# Altium PCB Acorn_Podulator_A4.PcbDoc
Units mil, origin at the board's own origin, x right, y up, seen from the top; angles counter-clockwise.
Board outline 1299.21 x 3818.9 mil, 2 copper layers (Top Layer, Bottom Layer), stack 61.855 mil thick; 6 components, 57 nets, 102 pads, 48 vias.
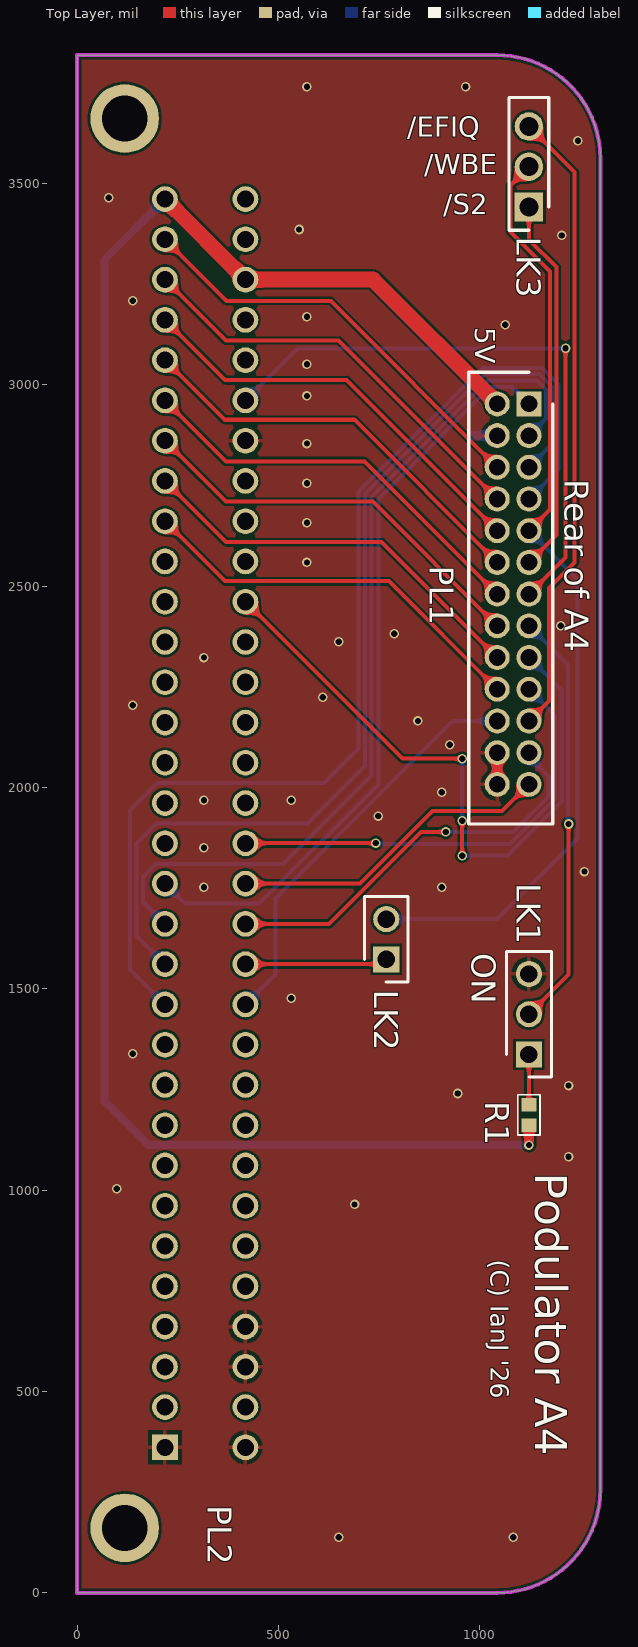
[diagram p0: Top Layer view]
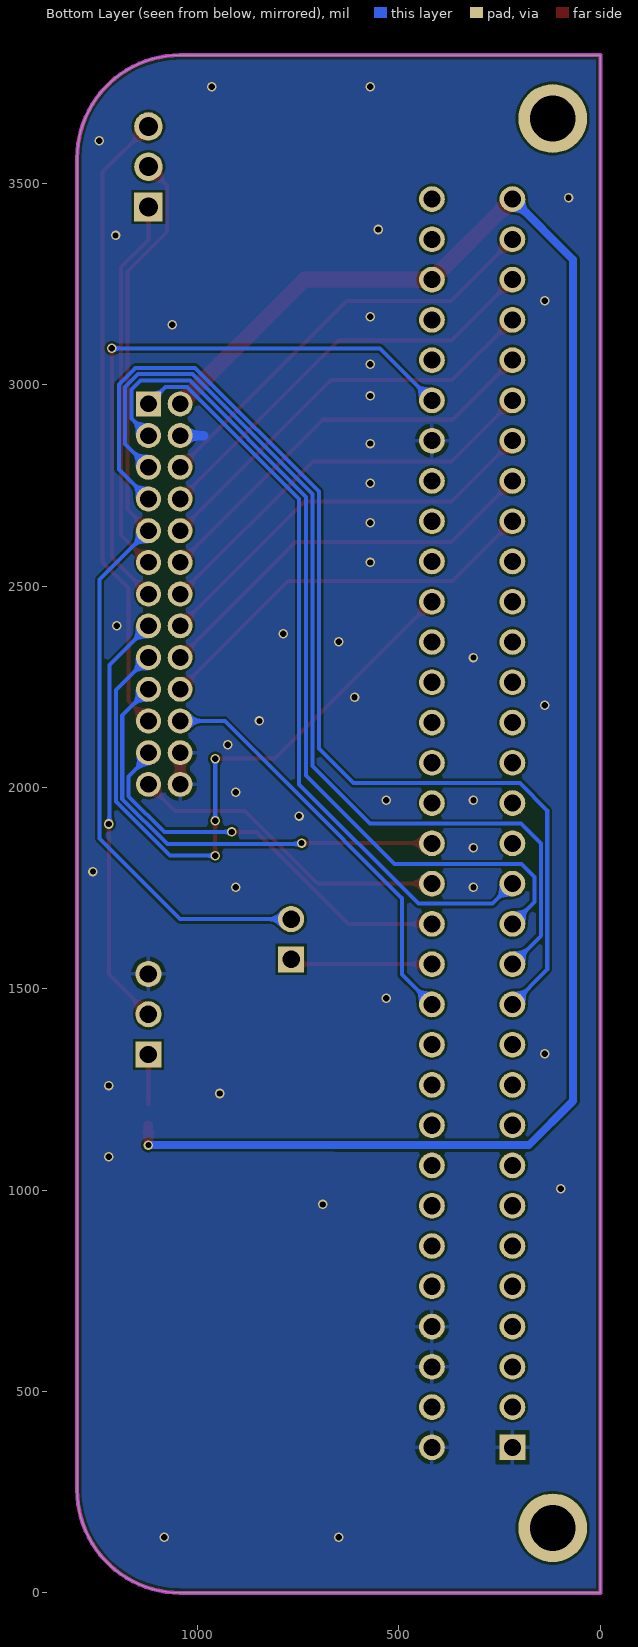
[diagram p1: Bottom Layer view, seen from below]
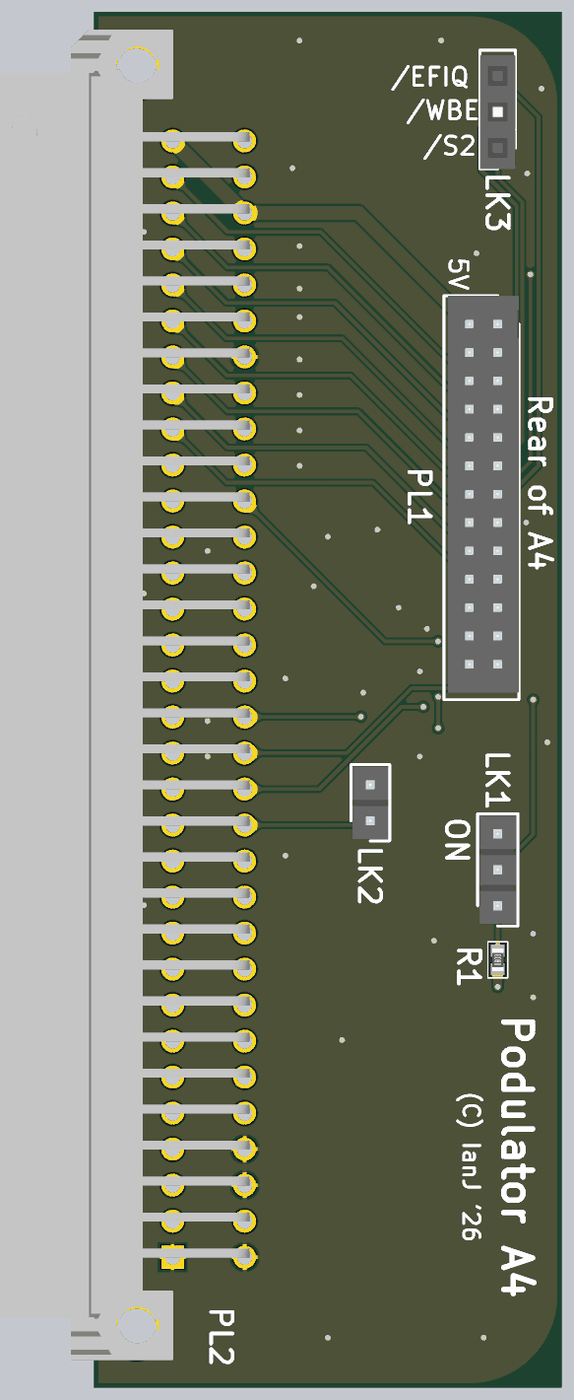
[diagram p2: 3D render of the assembled board from above, using the file's embedded part models]

## Layer stack, top to bottom
Top Solder: solder mask 0.4, Solder Resist, Dk 3.5
Top Layer: signal copper 1.4
FR4: dielectric 59.0551, FR-4, Dk 4.8
Bottom Layer: signal copper 1.4
Bottom Solder: solder mask 0.4, Solder Resist, Dk 3.5

## Board outline
0,0 0,3818.9 1043.31,3818.9 cw(c1043.31,3562.99) 1299.21,3562.99 1299.21,255.91 cw(c1043.31,255.91) 1043.31,0

## Design rules (kind name [scope] priority, off if disabled: settings)
Clearance [All] p1: gap=5.91 ignorepadtopadclearanceinfootprint=FALSE
DiffPairsRouting [All] p1: maxlimit=10 minlimit=8 mostfreqgap=8 toplayer_minwidth=12 toplayer_maxwidth=15 toplayer_prefwidth=12 bottomlayer_minwidth=12 bottomlayer_maxwidth=15 bottomlayer_prefwidth=12 maxuncoupledlength=500
HoleSize [All] p1: absolutevalues=TRUE maxlimit=157.48 minlimit=1 maxpercent=80.000 minpercent=20.000
MinimumSolderMaskSliver [All] p1: minsoldermaskwidth=1
PolygonConnect [All] p1: connectstyle=Relief reliefconductorwidth=10 reliefentries=4 polygonreliefangle="90 Angle" airgapwidth=10
RoutingVias [All] p1: holewidth=28 width=50 viastyle="Through Hole" minholewidth=15 minwidth=20 maxholewidth=28 maxwidth=50
SilkToSilkClearance [All] p1: silktosilkclearance=3.94
SilkToSolderMaskClearance [IsPad] p1: minsilkscreentomaskgap=3.94 clearancetoexposedcopper=TRUE
SolderMaskExpansion [All] p1: expansion=4 istentingtop=FALSE
SupplyNets "Schematic Supply Nets_2" [InNet('12V')] p1: voltage=0.000
SupplyNets "Schematic Supply Nets_1" [InNet('-5V')] p2: voltage=0.000
SupplyNets "Schematic Supply Nets_3" [InNet('GND')] p3: voltage=0.000
SupplyNets "Schematic Supply Nets" [InNet('5V')] p4: voltage=0.000
Width [All] p1: maxlimit=39.37 minlimit=10 preferedwidth=10
25 further rules are at their usual default settings.

## Components (designator, comment, footprint, x,y, rotation, side; value= is the part's Value field where it differs from the comment)
LK1 "PREC003SAAN-RC" HDRV3W64P0X254_1X3_762X254X868P 1122.05,1337.01 r90 top
LK2 "PREC002SAAN-RC" HDRV2W64P0X254_1X2_508X254X854P 767.72,1573.23 r90 top
LK3 "M20-7820346" RHDR3W70P0X254_1X3_802X250X850P 1122.05,3441.73 r90 top
PL1 "DF11-26DP-2DSA_24_" SHDR26W60P200_2X13_2800X500X690P 1122.05,2952.76 r90 top locked
PL2 "5650945-5" 56509455 218.11,361.42 r270 top locked
R1 "10K" "RES 0603" 1122.05,1187.01 r90 top

## Footprints (in the part's own frame and the unit in brackets; to place one, negate y for a bottom-side part, rotate by r counter-clockwise, add the part's x,y. Pads: shape width x height; smd on the part's side, far side on the other; paste and mask are expansions set on the pad)
56509455 [mm]
  rect 1.62x1.62 hole 1.08: A1(0,0)
  round 1.62 hole 1.08: A2(-2.54,0) A3(-5.08,0) A4(-7.62,0) A5(-10.16,0) A6(-12.7,0) A7(-15.24,0) A8(-17.78,0) A9(-20.32,0) A10(-22.86,0) A11(-25.4,0) A12(-27.94,0) A13(-30.48,0) A14(-33.02,0) A15(-35.56,0) A16(-38.1,0) A17(-40.64,0) A18(-43.18,0) A19(-45.72,0) A20(-48.26,0) A21(-50.8,0) A22(-53.34,0) A23(-55.88,0) A24(-58.42,0) A25(-60.96,0) A26(-63.5,0) A27(-66.04,0) A28(-68.58,0) A29(-71.12,0) A30(-73.66,0) A31(-76.2,0) A32(-78.74,0) C1(0,5.08) C2(-2.54,5.08) C3(-5.08,5.08) C4(-7.62,5.08) C5(-10.16,5.08) C6(-12.7,5.08) C7(-15.24,5.08) C8(-17.78,5.08) C9(-20.32,5.08) C10(-22.86,5.08) C11(-25.4,5.08) C12(-27.94,5.08) C13(-30.48,5.08) C14(-33.02,5.08) C15(-35.56,5.08) C16(-38.1,5.08) C17(-40.64,5.08) C18(-43.18,5.08) C19(-45.72,5.08) C20(-48.26,5.08) C21(-50.8,5.08) C22(-53.34,5.08) C23(-55.88,5.08) C24(-58.42,5.08) C25(-60.96,5.08) C26(-63.5,5.08) C27(-66.04,5.08) C28(-68.58,5.08) C29(-71.12,5.08) C30(-73.66,5.08) C31(-76.2,5.08) C32(-78.74,5.08)
  round 4.335 hole 2.89: MH1(5.08,-2.54) MH2(-83.82,-2.54)
  body extent -86.58,-12.59 7.26,5.43, height 9.55
HDRV2W64P0X254_1X2_508X254X854P [mm]
  rect 1.65x1.65 hole 1.1: 1(0,0)
  round 1.65 hole 1.1: 2(2.54,0)
  silkscreen extent -1.42,-1.37 3.96,1.37, body extent -1.27,-1.27 3.81,1.27, height 8.54
HDRV3W64P0X254_1X3_762X254X868P [mm]
  rect 1.65x1.65 hole 1.1: 1(0,0)
  round 1.65 hole 1.1: 2(2.54,0) 3(5.08,0)
  silkscreen extent -1.42,-1.42 6.5,1.42, body extent -1.27,-1.27 6.35,1.27, height 8.68
"RES 0603" [mm] "Chip Resistor, 2-Leads, Body 1.60x0.80mm, IPC Medium Density"
  rect 0.85x0.95 smd: 1(-0.65,0) 2(0.65,0)
  silkscreen extent -1.27,-0.7 1.27,0.7, body extent -0.8,-0.4 0.8,0.4, height 0.45
RHDR3W70P0X254_1X3_802X250X850P [mm]
  rect 1.8x1.8 hole 1.2: 1(0,0)
  round 1.8 hole 1.2: 2(2.54,0) 3(5.08,0)
  silkscreen extent -1.47,-1.25 6.9,1.25, body extent -1.47,-1.25 6.55,1.25, height 8.5
SHDR26W60P200_2X13_2800X500X690P [mm]
  rect 1.575x1.575 hole 1.05: 1(0,0)
  round 1.575 hole 1.05: 2(0,2) 3(-2,0) 4(-2,2) 5(-4,0) 6(-4,2) 7(-6,0) 8(-6,2) 9(-8,0) 10(-8,2) 11(-10,0) 12(-10,2) 13(-12,0) 14(-12,2) 15(-14,0) 16(-14,2) 17(-16,0) 18(-16,2) 19(-18,0) 20(-18,2) 21(-20,0) 22(-20,2) 23(-22,0) 24(-22,2) 25(-24,0) 26(-24,2)
  silkscreen extent -26.5,-1.5 2,3.8, body extent -26,-1.5 2,3.5, height 6.9

## Part data
LK1 LK2: "Connector", Manufacturer_Name=Sullins
  LK1: Datasheet Link=https://media.digikey.com/PDF/Data%20Sheets/Sullins%20PDFs/z%20RzCzzzSzzN-RC,%20ST,11635-B.pdf, Height=8.68mm, Manufacturer_Part_Number=PREC003SAAN-RC
  LK2: Datasheet Link=https://drawings-pdf.s3.amazonaws.com/11635.pdf, Height=8.54mm, Manufacturer_Part_Number=PREC002SAAN-RC
LK3: "Connector", Manufacturer_Name=Harwin, Mouser Part Number=855-M20-7820346, Datasheet Link=https://content.harwin.com/m/c2ac50ebb1c800d5/original/DRG-00385-Technical-Drawing-Datasheet-M20-782-pdf.pdf, Height=8.5mm, Manufacturer_Part_Number=M20-7820346, Mouser Price/Stock=https://www.mouser.co.uk/ProductDetail/Harwin/M20-7820346?qs=vF78I%252BjhbY%252BngA3JRz8Iyw%3D%3D
PL1: "Connector", Manufacturer_Name=Hirose, Manufacturer_Part_Number=DF11-26DP-2DSA(24), Mouser Part Number=798-DF11-26DP-2DSA24, Datasheet Link=https://www.hirose.com/product/en/products/DF11/DF11-26DP-2DSA%2824%29/, Height=6.9mm, Mouser Price/Stock=https://www.mouser.co.uk/ProductDetail/Hirose-Connector/DF11-26DP-2DSA24?qs=zOgoZG1CgI91EYYyNVwN2g%3D%3D
PL2: "Connector", Manufacturer_Name="TE Connectivity", Mouser Part Number=571-5650945-5, Arrow Part Number=5650945-5, Arrow Price/Stock=https://www.arrow.com/en/products/5650945-5/te-connectivity, Datasheet Link=https://www.te.com/commerce/DocumentDelivery/DDEController?Action=showdoc&DocId=Customer+Drawing%7F650473%7FS%7Fpdf%7FEnglish%7FENG_CD_650473_S_baseFilename.pdf%7F5650945-5, Height=11.1mm, Manufacturer_Part_Number=5650945-5, Mouser Price/Stock=https://www.mouser.co.uk/ProductDetail/TE-Connectivity/5650945-5?qs=%2FFe7VTH785B%252B77b5t925bQ%3D%3D
R1: library part RES_10K_0603_1PCT_0, "RES 10K, 0603, 1/10W, 1%, +/-50PPM", Distributor1 Part No=RB103, Distributor2 Part No=311-10.0KHRTR-ND, Manufacturer1=EUROHM, Manufacturer2=Yageo, Tolerance=1%, ComponentLink1Description=ComponentLinknURL1, ComponentLink1URL=http://resources.anglia.com/pdf/product/eur/datasheets/smr_series(2).pdf, ComponentLink2Description=ComponentLinknURL2, ComponentLink2URL=https://www.yageo.com/upload/media/product/productsearch/datasheet/rchip/PYu-RC_Group_51_RoHS_L_10.pdf, Distributor1=Anglia, Distributor2=Digikey, ManuPart1=P9B1ERR1000, ManuPart2=RC0603FR-0710KL

## Via types
v1: diameter 23.62, hole 15.75, Top Layer to Bottom Layer, tented both sides, 48 vias

## Nets (pads, with @x,y where several pads share a name; then routed paths per layer and width w, separated by ;. In a path a pad name is that pad's centre, name@x,y a point inside that pad or via, vN(x,y) a via of type N, cw(c..) or ccw(c..) an arc to the next point about the centre after c; other vN are vias at no path point)
5V: PL1.2 PL2.A32 PL2.C30 R1.1 | length 4487.3
  Top Layer w23.62: v1(1122.05,1112.2) R1.1
  Top Layer w39.37: PL2.A32 PL2.C30 734.65,3261.42 PL1.2
  Bottom Layer w19.68: PL2.A32 67.55,3310.86 67.55,1221.83 177.57,1111.81 659.61,1111.81 660,1112.2 v1(1122.05,1112.2)
12V: PL2.C32
-5V: PL2.C2
/BL: PL2.C25
/ECON: LK1.2 PL1.15 | length 1046.1
  Top Layer w10: LK1.2 1220.47,1535.43 v1(1220.47,1909.45)
  Bottom Layer w10: PL1.15 1218.98,2304.65 1218.98,1910.94 v1(1220.47,1909.45)
/EFIQ: LK3.3 PL1.21 | length 1570.5
  Top Layer w10: PL1.21 1171.75,2215.05 1171.75,2495.17 1235.63,2559.06 1235.63,3528.15 LK3.3
/IOGT: PL2.C23
/IORQ: PL2.C24
/MS: PL2.C6
/PFIQ: PL2.C17
/PIRQ: PL1.19 PL2.C16 | length 1116.1
  Top Layer w10: PL2.C16 418.5,1861.81 741.41,1861.81 v1(741.8,1862.2)
  Bottom Layer w10: v1(741.8,1862.2) 744.21,1859.8 1075.2,1859.8 1187.17,1971.76 1187.17,2178.98 PL1.19
/PRE: PL1.25 PL2.C15 | length 806
  Top Layer w10: PL2.C15 702.26,1761.42 882.3,1941.46 1055.63,1941.46 PL1.25
/PS: PL1.17 PL2.C22 | length 1635.5
  Top Layer w10: PL2.C22 807.81,2071.72 v1(956.03,2071.72) ; v1(956.38,1830.93) v1(956.38,1917.64)
  Bottom Layer w10: v1@954.72,1830.71 1068.61,1830.71 1203.07,1965.17 1203.07,2241.81 PL1.17 ; v1(956.03,2071.72) 956.21,2071.55 956.21,1917.81 v1(956.38,1917.64)
/PWE: PL1.23 PL2.C14 | length 1013.1
  Top Layer w10: PL2.C14 625.4,1661.42 853.74,1889.76 v1(915.35,1889.76)
  Bottom Layer w10: v1(915.35,1889.76) 1082.68,1889.76 1171.26,1978.35 1171.26,2027.56 1122.05,2076.77 PL1.23
/RST: PL1.22 PL2.C12 | length 1027.8
  Bottom Layer w10: PL2.C12 492.13,1535.43 492.13,1725.04 779.61,2012.52 932.44,2165.35 PL1.22
/S2: LK3.1 PL1.11 | length 939.1
  Top Layer w10: PL1.11 1190.2,2627.2 1190.2,3292.2 1122.05,3360.35 LK3.1
/S6: PL2.C18
/S7: PL2.C21
/WBE: LK2.2 LK3.2 PL1.9 | length 2358.7
  Top Layer w10: PL1.9 1174.29,2690.04 1174.29,3281.5 1075.71,3380.08 1075.71,3495.39 LK3.2
  Bottom Layer w10: LK2.2 1043.31,1673.23 1243.19,1873.11 1243.19,2516.65 PL1.9
BD8: PL2.A23
BD9: PL2.A22
BD10: PL2.A21
BD11: PL2.A20
BD12: PL2.A19
BD13: PL2.A18
BD14: PL2.A17
BD15: PL2.A16
C0_IDT: PL2.C20
C1_ICK: PL2.C19
CLK2: PL1.13 PL2.C27 | length 1496.2
  Top Layer w10: PL1.13 1212.91,2571.18 v1(1212.91,3090.55)
  Bottom Layer w10: PL2.C27 547.24,3090.55 v1(1212.91,3090.55)
CLK8: PL2.C28
D0: PL1.6 PL2.A31 | length 1059.7
  Top Layer w10: PL2.A31 370.87,3208.66 629.92,3208.66 PL1.6
D1: PL1.8 PL2.A30 | length 1050.9
  Top Layer w10: PL2.A30 369.29,3110.24 649.61,3110.24 PL1.8
D2: PL1.10 PL2.A29 | length 1042.1
  Top Layer w10: PL2.A29 367.72,3011.81 669.29,3011.81 PL1.10
D3: PL1.12 PL2.A28 | length 1033.3
  Top Layer w10: PL2.A28 366.14,2913.39 688.98,2913.39 PL1.12
D4: PL1.14 PL2.A27 | length 1024.5
  Top Layer w10: PL2.A27 369.59,2809.93 713.69,2809.93 PL1.14
D5: PL1.16 PL2.A26 | length 1015.7
  Top Layer w10: PL2.A26 369.17,2710.36 734.52,2710.36 PL1.16
D6: PL1.18 PL2.A25 | length 1006.9
  Top Layer w10: PL2.A25 369.87,2609.66 756.48,2609.66 PL1.18
D7: PL1.20 PL2.A24 | length 998.1
  Top Layer w10: PL2.A24 367.18,2512.35 775.05,2512.35 PL1.20
GND: LK1.3 PL1.4 PL1.24 PL1.26 PL2.A1 PL2.C1 PL2.C3 PL2.C4 PL2.C26 | length 137.8
  Top Layer w23.62: PL1.26 PL1.24
  Bottom Layer w23.62: 984.25,2874.02 PL1.4
  other v1: 649.61,137.8 1082.68,137.8 688.98,964.57 98.43,1003.94 1220.47,1082.68 944.88,1240.16 1220.47,1259.84 137.8,1338.58 531.5,1476.38 314.96,1751.97 905.51,1751.97 1259.84,1791.34 314.96,1850.39 748.03,1929.13 314.96,1968.5 531.5,1968.5 905.51,1988.19 925.2,2106.3 846.46,2165.35 137.8,2204.72 610.24,2224.41 314.96,2322.83 649.61,2362.2 787.4,2381.89 1200.79,2401.57 570.87,2559.06 570.87,2657.48 570.87,2755.91 570.87,2854.33 570.87,2972.44 570.87,3051.18 1062.99,3149.61 570.87,3169.29 137.8,3208.66 1203.72,3371.05 551.18,3385.83 78.74,3464.57 1243.85,3606.63 570.87,3740.16 964.57,3740.16
LA2: PL1.1 PL2.A15 | length 1888.5
  Bottom Layer w10: PL2.A15 267.75,1711.78 451.94,1711.78 748.03,2007.87 748.03,2716.75 1025.95,2994.67 1080.14,2994.67 PL1.1
LA3: PL1.3 PL2.A14 | length 2196.5
  Bottom Layer w10: PL2.A14 163.52,1716.01 163.52,1778.21 195.44,1810.13 510.92,1810.13 730.89,2030.1 730.89,2722.1 1019.36,3010.57 1141.66,3010.57 1163.96,2988.28 1163.96,2915.92 PL1.3
LA4: PL1.5 PL2.A13 | length 2475.8
  Bottom Layer w10: PL2.A13 147.62,1631.91 147.62,1860.84 197.18,1910.4 571.82,1910.4 714.99,2053.57 714.99,2728.69 1012.77,3026.48 1148.25,3026.48 1179.86,2994.87 1179.86,2853.09 PL1.5
LA5: PL1.7 PL2.A12 | length 2743.6
  Bottom Layer w10: PL2.A12 131.71,1547.82 131.71,1943.47 199.3,2011.06 613.42,2011.06 699.08,2096.72 699.08,2735.28 1006.18,3042.38 1154.84,3042.38 1195.77,3001.45 1195.77,2790.26 PL1.7
LA6: PL2.A11
LA7: PL2.A10
LA8: PL2.A9
LA9: PL2.A8
LA10: PL2.A7
LA11: PL2.A6
LA12: PL2.A5
LA13: PL2.A4
LA14: PL2.A3
LA15: PL2.A2
NetLK1_1: LK1.1 R1.2 | length 124.4
  Top Layer w10: R1.2 LK1.1
PR/W: LK2.1 PL2.C13 | length 354.5
  Top Layer w10: PL2.C13 755.91,1561.42 LK2.1
REF8M: PL2.C29
pads on no net: PL2.C5 PL2.C7 PL2.C8 PL2.C9 PL2.C10 PL2.C11 PL2.C31 PL2.MH1 PL2.MH2

## Polygon pours and split planes (outlines as drawn)
GND on Top Layer "NONET_L-01_P-001" (solid, remove dead copper, pour order 0): 0,0 1299.21,0 1299.21,3818.9 0,3818.9
GND on Bottom Layer "NONET_L-01_P-001" (solid, remove dead copper, pour order 1): 0,0 1299.21,0 1299.21,3818.9 0,3818.9

## Keep-outs
Keep-Out Layer:
  the board outline again, w10

## Silkscreen, mask and mechanical layers (free items; w line width, h text height)
Top Overlay:
  text "/EFIQ" at 820.05,3615.75 h50
  text "/WBE" at 862.19,3522.92 h50
  text "/S2" at 909.6,3424.15 h50
  text "5V" at 988.57,3143.14 h50 r270
  text "Rear of A4" at 1210.79,2765.59 h60 r270
  text "ON" at 980.03,1588.48 h60 r270
  text "Podulator A4" at 1138,1043.49 h80 r270
  text "(C) IanJ '26" at 1027,826.69 h45 r270